# Altium PCB CW341_KintexUSTarget.PcbDoc (part 4 of 7)
Units mil, origin at the board's own origin, x right, y up, seen from the top; angles counter-clockwise.
Board outline 4566.97 x 5485 mil, 6 copper layers (Top Layer, Layer 2 (GND), Layer 3 (sig), Layer 4 (sig), Layer 5 (PWR), Bottom Layer), stack 61.068 mil thick; 157 components, 262 nets, 1869 pads, 1478 vias.
Unrouted connection lines stored in the file: 128.
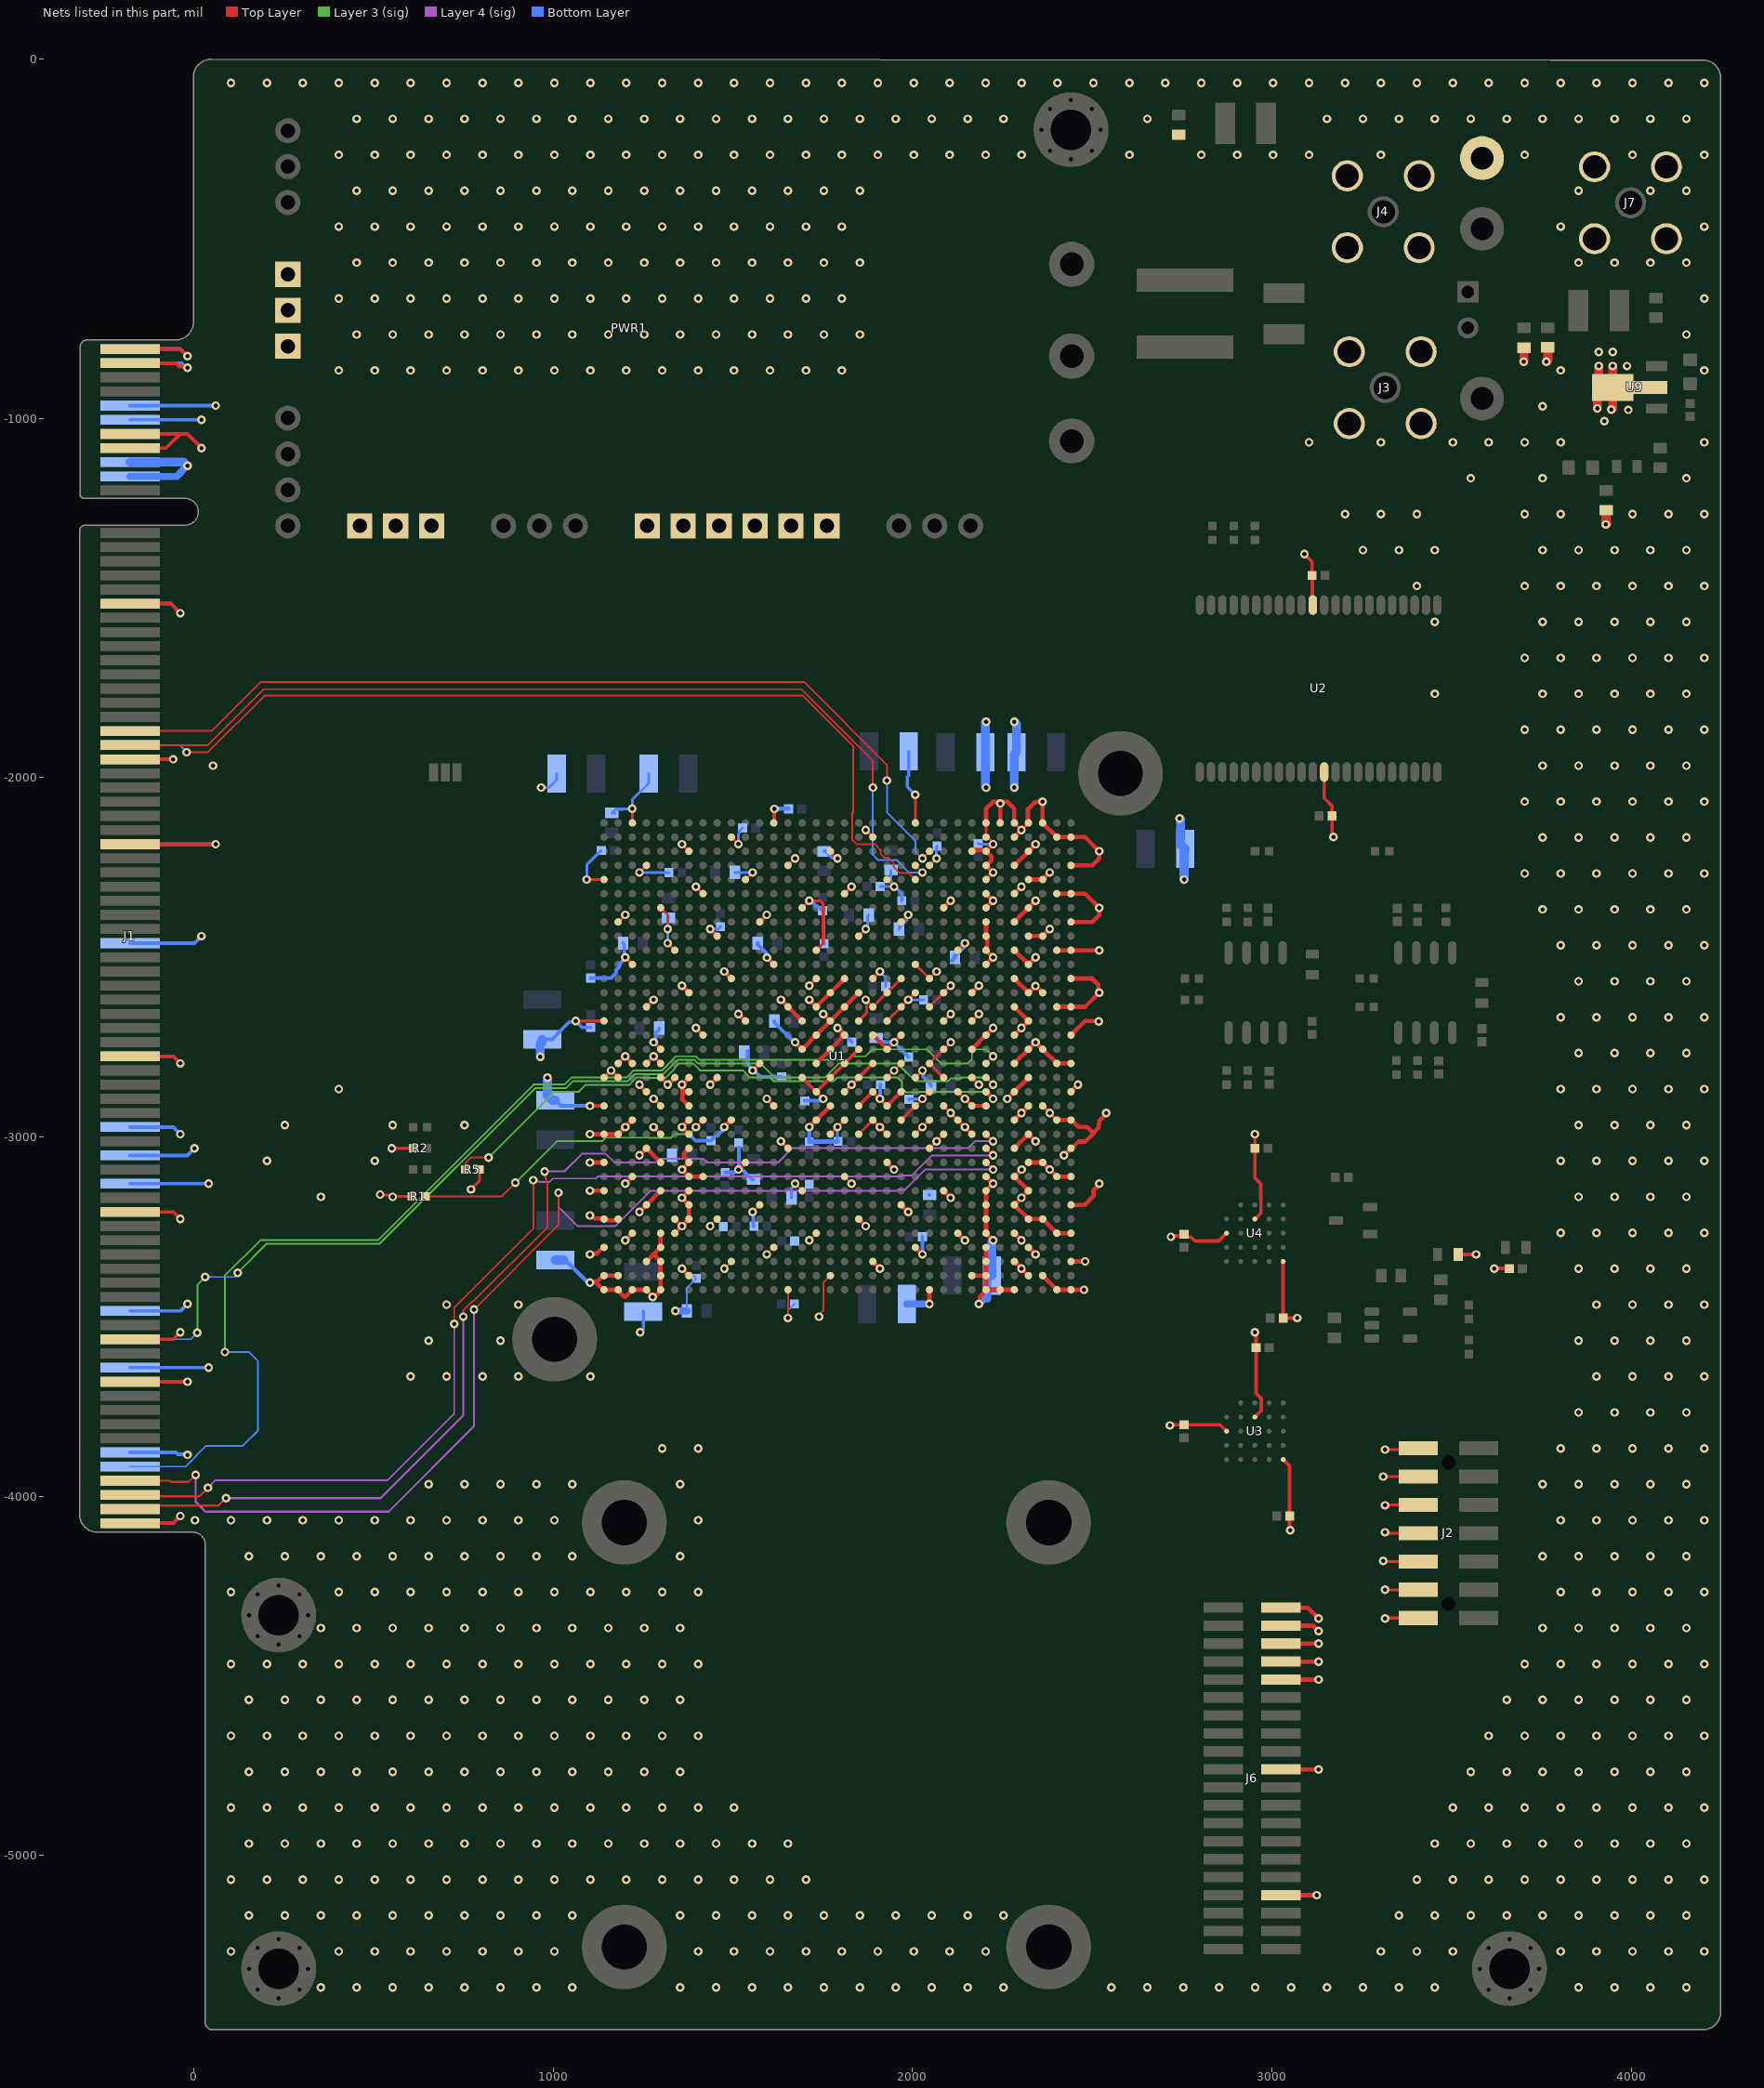
[diagram p7: the nets of this part, all layers, seen from the top]

## Via types
v1: diameter 24, hole 12, Top Layer to Bottom Layer, tented both sides, 1463 vias
v2: diameter 24, hole 10, Top Layer to Bottom Layer, tented both sides, 15 vias

## Nets (pads, with @x,y where several pads share a name; then routed paths per layer and width w, separated by ;. In a path a pad name is that pad's centre, name@x,y a point inside that pad or via, vN(x,y) a via of type N, cw(c..) or ccw(c..) an arc to the next point about the centre after c; other vN are vias at no path point) (continued)
CFG_PGM: J1.A69 U1.T7 | length 2899
  Top Layer w5: U1.T7@2204.72,-2834.65 v1(2224.41,-2854.33)
  Layer 3 (sig) w5: v1(10,-3545) 10,-3411.26 v1(31.5,-3389.76) ; v1@127.66,-3377.95 127.66,-3372.34 202.78,-3297.22 516.71,-3297.22 949.78,-2864.15 1035.84,-2864.15 1055.53,-2844.46 1208.31,-2844.46 1227.94,-2824.83 1252.38,-2824.83 1252.64,-2825.09 1306.42,-2825.09 1346.05,-2785.46 1393.55,-2785.46 1403.81,-2795.72 1501.02,-2795.72 1501.28,-2795.46 1563.2,-2795.46 1563.46,-2795.72 1578.18,-2795.72 1616.92,-2834.46 1755,-2834.46 1793.74,-2795.72 1822.37,-2795.72 1822.63,-2795.46 1956.9,-2795.46 1959.55,-2798.12 1961.64,-2798.12 2007.98,-2844.46 2099.06,-2844.46 2106.98,-2836.54 2135.89,-2836.54 2137.59,-2834.83 2193.12,-2834.83 2194.82,-2836.54 2206.62,-2836.54 v1(2224.41,-2854.33)
  Bottom Layer w5: J1.A69@-177.17,-3562.99 -7.99,-3562.99 v1(10,-3545) ; v1(31.5,-3389.76) 114.17,-3389.76 122.05,-3381.89 v1(122.05,-3377.95)
CFG_PUDC: R5.1 U1.R7 | length 1691.1
  Top Layer w5: R5.1@755.91,-3090.55 755.91,-3072.83 771.57,-3057.17 v1(820.83,-3057.17)
  Top Layer w12: U1.R7@2204.72,-2874.02 v1(2224.41,-2893.7)
  Layer 3 (sig) w5: v1(820.83,-3057.17) 1003.86,-2874.15 1071.6,-2874.15 1091.28,-2854.46 1212.45,-2854.46 1232.08,-2834.83 1248.23,-2834.83 1248.49,-2835.09 1312.65,-2835.09 1338.77,-2808.97 1338.77,-2806.88 1350.19,-2795.46 1389.41,-2795.46 1408.78,-2814.83 1527.41,-2814.83 1547.41,-2834.83 1603.14,-2834.83 1612.77,-2844.46 1781.06,-2844.46 1790.69,-2834.83 1958.98,-2834.83 1970.59,-2846.44 1970.59,-2863.58 1982.2,-2875.19 2020.58,-2875.19 2021.57,-2874.2 2207,-2874.2 2224.41,-2891.61 v1(2224.41,-2893.7)
CFG_RDWR: J1.A78 U1.U7 | length 3391.5
  Top Layer w5: U1.U7@2204.72,-2795.28 v1(2224.41,-2775.59)
  Layer 3 (sig) w5: v1(86.61,-3598.43) 86.61,-3385.81 185.21,-3287.22 512.57,-3287.22 945.64,-2854.15 1031.7,-2854.15 1051.38,-2834.46 1204.17,-2834.46 1223.8,-2814.83 1256.52,-2814.83 1256.78,-2815.09 1302.28,-2815.09 1341.91,-2775.46 1397.7,-2775.46 1407.96,-2785.72 1496.88,-2785.72 1497.14,-2785.46 1613.1,-2785.46 1613.35,-2785.72 1820.32,-2785.72 1830.58,-2775.46 1869.01,-2775.46 1888.38,-2756.09 2039.81,-2756.09 2078.81,-2795.09 2153.75,-2795.09 2165.35,-2783.48 2165.35,-2767.7 2176.96,-2756.09 2204.91,-2756.09 v1(2224.41,-2775.59)
  Bottom Layer w5: J1.A78@-177.17,-3917.32 -22.84,-3917.32 35.03,-3859.45 136.61,-3859.45 179,-3817.06 179,-3623.88 153.54,-3598.43 v1(86.61,-3598.43)
CSI_ADV_B: R1.1 U1.N27 | length 861.1
  Top Layer w5: R1.1@645.67,-3165.35 856.84,-3165.35 v1(895.07,-3127.12) ; v1(1397.64,-2972.44) U1.N27@1417.32,-2952.76
  Layer 3 (sig) w5: v1(895.07,-3127.12) 1010.56,-3011.63 1136.4,-3011.63 1146.35,-3001.68 1267.05,-3001.68 1267.31,-3001.94 1328.77,-3001.94 1338.4,-2992.31 1379.73,-2992.31 1397.64,-2974.4 v1(1397.64,-2972.44)
CWIO_HS1: J1.A27 U1.AK12 | length 2640.1
  Top Layer w5: v1(-19.69,-1929.13) 39.37,-1929.13 196.85,-1771.65 1694.26,-1771.65 1835.36,-1912.75 1835.36,-2094.7 1832.46,-2097.59 1832.46,-2172.78 1844.72,-2185.04 1895.44,-2185.04 1911.2,-2200.8 1911.2,-2212.15 1921.71,-2222.66 1933.06,-2222.66 1947.07,-2236.67 1947.07,-2248.02 1964.58,-2265.53 1989.94,-2265.53 U1.AK12@2007.87,-2283.46
  Bottom Layer w5: J1.A27@-177.17,-1909.45 -39.37,-1909.45 v1(-19.69,-1929.13)
CWIO_HS2: J1.B27 U1.AL12 | length 2662.2
  Top Layer w5: J1.B27@-177.17,-1909.45 39.37,-1909.45 194.96,-1753.86 1690.61,-1753.86 1889.76,-1953.01 v1(1889.76,-2027.56) ; U1.AL12@2007.87,-2244.09 v1(2027.56,-2263.78)
  Bottom Layer w5: v1(1889.76,-2027.56) 1889.76,-2214.57 1904.86,-2229.66 1956.57,-2229.66 1966.26,-2239.35 1966.26,-2239.77 1990.86,-2264.36 2026.98,-2264.36 v1(2027.56,-2263.78)
CWIO_IO4: J1.B26 U1.AM11 | length 2587.1
  Top Layer w5: J1.B26@-177.17,-1870.08 50.46,-1870.08 186.68,-1733.86 1698.89,-1733.86 1929.13,-1964.1 1929.13,-2007.74 v1(1929,-2007.87) ; v1(2027.56,-2224.41) U1.AM11@2047.24,-2204.72
  Bottom Layer w5: v1(1929,-2007.87) 1929,-2096.19 2008.06,-2175.24 2008.06,-2204.91 v1(2027.56,-2224.41)
FPGA_M0: J1.B79 U1.K7 | length 3262.8
  Top Layer w5: v1(780,-3480) 1015,-3245 v1(1015,-3155)
  Top Layer w6: J1.B79@-177.17,-3956.69 -65.56,-3956.69 -62.25,-3960 -14.48,-3960 v1(5.26,-3940.26)
  Top Layer w8: U1.K7@2204.72,-3070.87 v1(2224.41,-3090.55)
  Layer 4 (sig) w5: v1(1015,-3155) 1015,-3194.87 1067.84,-3247.72 1173.53,-3247.72 1271.69,-3149.55 1445.09,-3149.55 1445.21,-3149.42 1956.9,-3149.42 1959.28,-3147.03 1978.61,-3147.03 2035.1,-3090.55 v1(2224.41,-3090.55)
  Layer 4 (sig) w6: v1(5.26,-3940.26) 5.26,-4015.26 32.51,-4042.51 542.49,-4042.51 780,-3805 v1(780,-3480)
FPGA_M1: J1.B80 U1.L7 | length 3086.1
  Top Layer w5: v1(725,-3520) 725,-3475 944.88,-3255.12 v1(944.88,-3119.92)
  Top Layer w6: J1.B80@-177.17,-3996.06 -173.23,-4000 15.75,-4000 v1(39.37,-3976.38)
  Top Layer w8: U1.L7@2204.72,-3031.5 v1(2224.41,-3051.18)
  Layer 4 (sig) w5: v1@44.51,-3976.38 v1(39.37,-3976.38) 60.75,-3955 540,-3955 725,-3770 v1(725,-3520) ; v1(944.88,-3119.92) 948.52,-3123.56 961.95,-3123.56 964.17,-3125.77 988.37,-3125.77 998.64,-3115.5 1119.4,-3115.5 1124.61,-3110.29 1967.27,-3110.29 1969.97,-3107.59 1997.78,-3107.59 2054.19,-3051.18 v1(2224.41,-3051.18)
FPGA_M2: J1.B81 U1.M7 | length 3154.8
  Top Layer w5: v1(750,-3500) 750,-3482.42 773.96,-3458.46 776.54,-3458.46 984.25,-3250.75 984.25,-3128.27 981.75,-3125.77 981.75,-3118.91 979.15,-3116.3 979.15,-3099.03 v1(976.27,-3096.15)
  Top Layer w6: J1.B81@-177.17,-4035.43 -167.32,-4025.59 69.41,-4025.59 v1(90,-4005)
  Top Layer w8: U1.M7@2204.72,-2992.13 v1(2224.41,-3011.81)
  Layer 4 (sig) w5: v1(976.27,-3096.15) 976.92,-3095.5 1031.57,-3095.5 1080.41,-3046.65 1146.39,-3046.65 1170.42,-3070.68 1285.26,-3070.68 1294.89,-3061.05 1419.25,-3061.05 1429.14,-3070.94 1625.89,-3070.94 1665.52,-3031.31 2153.75,-3031.31 2173.25,-3011.81 v1(2224.41,-3011.81)
  Layer 4 (sig) w6: v1(90,-4005) 520,-4005 750,-3775 v1(750,-3500)
GND: C1.2 C2.2 C3.2 C4.2 C7.2 C8.2 C9.2 C11.2 C19.2 C20.2 C21.2 C22.2 C23.2 C24.2 C25.2 C26.2 C27.2 C29.2 C30.2 C31.2 C32.2 C33.2 C34.2 C35.2 C36.2 C37.2 C38.2 C39.2 C40.2 C41.2 C42.2 C43.2 C44.2 C45.2 C46.2 C47.2 C48.2 C49.2 C50.2 C51.2 C52.2 C53.2 C54.2 C55.2 C56.2 C57.2 C58.2 C59.2 C60.2 C61.2 C62.2 C63.2 C64.2 C65.2 C66.2 C67.2 C68.2 C69.2 C70.2 C71.2 C72.2 C73.2 C74.2 C75.2 C76.2 C77.2 C78.2 C79.2 C80.2 C81.2 C82.2 C83.2 C84.2 C85.2 C86.1 C87.1 C88.2 C94.2 J1.A1 J1.A2 J1.A5 J1.A6 J1.A9 J1.A10 J1.A17 J1.A28 J1.A34 J1.A41 J1.A49 J1.A54 J1.A56 J1.A58 J1.A67 J1.A71 J1.A77 J1.A82 J1.B1 J1.B2 J1.B7 J1.B8 J1.B17 J1.B28 J1.B34 J1.B49 J1.B60 J1.B69 J1.B72 J1.B82 J2.1 J2.3 J2.5 J2.7 J2.9 J2.11 J2.13 J3.MH J4.MH J6.2 J6.4 J6.6 J6.8 J6.10 J6.20 J6.34 J7.MH L4.1 PWR1.4 PWR1.5 PWR1.6 PWR1.11 PWR1.12 PWR1.13 PWR1.17 PWR1.18 PWR1.19 PWR1.20 PWR1.21 PWR1.22 R1.2 R2.2 R5.2 TP4.1 U1.A1 U1.A2 U1.A5 U1.A6 U1.A7 U1.A11 U1.A21 U1.A30 U1.A31 U1.A32 U1.A33 U1.A34 U1.AA1 U1.AA2 U1.AA5 U1.AA11 U1.AA13 U1.AA15 U1.AA17 U1.AA19 U1.AA21 U1.AA31 U1.AB3 U1.AB4 U1.AB8 U1.AB10 U1.AB12 U1.AB14 U1.AB16 U1.AB18 U1.AB28 U1.AC1 U1.AC5 U1.AC11 U1.AC13 U1.AC15 U1.AC17 U1.AC19 U1.AC25 U1.AD4 U1.AD7 U1.AD12 U1.AD22 U1.AD32 U1.AE1 U1.AE2 U1.AE5 U1.AE7 U1.AE9 U1.AE19 U1.AE29 U1.AF3 U1.AF4 U1.AF7 U1.AF16 U1.AF26 U1.AG1 U1.AG5 U1.AG7 U1.AG13 U1.AG23 U1.AG33 U1.AH4 U1.AH7 U1.AH10 U1.AH20 U1.AH30 U1.AJ1 U1.AJ2 U1.AJ5 U1.AJ7 U1.AJ17 U1.AJ27 U1.AK3 U1.AK4 U1.AK7 U1.AK14 U1.AK24 U1.AK34 U1.AL1 U1.AL5 U1.AL7 U1.AL11 U1.AL21 U1.AL31 U1.AM4 U1.AM7 U1.AM8 U1.AM18 U1.AM28 U1.AN1 U1.AN2 U1.AN5 U1.AN7 U1.AN15 U1.AN25 U1.AP3 U1.AP4 U1.AP5 U1.AP6 U1.AP7 U1.AP12 U1.AP22 U1.AP32 U1.B3 U1.B4 U1.B7 U1.B8 U1.B18 U1.B28 U1.B30 U1.B33 U1.B34 U1.C1 U1.C5 U1.C7 U1.C15 U1.C25 U1.C30 U1.C31 U1.D4 U1.D7 U1.D12 U1.D22 U1.D30 U1.D34 U1.E1 U1.E2 U1.E5 U1.E7 U1.E9 U1.E19 U1.E29 U1.E30 U1.E32 U1.F3 U1.F4 U1.F7 U1.F16 U1.F26 U1.F28 U1.F29 U1.F33 U1.F34 U1.G1 U1.G5 U1.G7 U1.G13 U1.G23 U1.G28 U1.G31 U1.H4 U1.H7 U1.H10 U1.H20 U1.H28 U1.H30 U1.H34 U1.J1 U1.J2 U1.J5 U1.J7 U1.J17 U1.J27 U1.J28 U1.J32 U1.K3 U1.K4 U1.K14 U1.K24 U1.K28 U1.K30 U1.K34 U1.L1 U1.L5 U1.L11 U1.L21 U1.L28 U1.L31 U1.M4 U1.M8 U1.M10 U1.M12 U1.M14 U1.M16 U1.M18 U1.M28 U1.M30 U1.M33 U1.M34 U1.N1 U1.N2 U1.N5 U1.N9 U1.N11 U1.N13 U1.N15 U1.N17 U1.N19 U1.N25 U1.N28 U1.N32 U1.P3 U1.P4 U1.P7 U1.P8 U1.P10 U1.P12 U1.P14 U1.P16 U1.P18 U1.P22 U1.P28 U1.P30 U1.P34 U1.R1 U1.R5 U1.R9 U1.R11 U1.R13 U1.R15 U1.R17 U1.R19 U1.R28 U1.R31 U1.T4 U1.T8 U1.T10 U1.T12 U1.T14 U1.T16 U1.T18 U1.T20 U1.T26 U1.T28 U1.T29 U1.T30 U1.T33 U1.T34 U1.U1 U1.U2 U1.U5 U1.U11 U1.U13 U1.U15 U1.U17 U1.U19 U1.U23 U1.U30 U1.U31 U1.U32 U1.U33 U1.V3 U1.V4 U1.V8 U1.V10 U1.V14 U1.V16 U1.V18 U1.V20 U1.V30 U1.W1 U1.W5 U1.W7 U1.W13 U1.W15 U1.W17 U1.W19 U1.W27 U1.Y4 U1.Y8 U1.Y10 U1.Y14 U1.Y16 U1.Y18 U1.Y20 U1.Y24 U1.Y34 U2.12 U2.34 U3.B3 U3.C1 U3.E5 U4.B3 U4.C1 U4.E5 U9.2 U9.4 | length 25088.7
  Top Layer w5: v1(1437.01,-3248.03) U1.F26@1456.69,-3228.35 ; v1(1476.66,-3366.43) 1476.66,-3366.14 1496.06,-3346.74 U1.C25@1496.06,-3346.46 ; v1(1555.12,-3208.66) U1.G23@1574.8,-3188.98 ; v1(1594.49,-3326.77) U1.D22@1614.17,-3307.09 ; v1(1653.54,-3503.94) U1.A21@1653.54,-3425.2 ; v1(1673.23,-3129.92) U1.H20@1692.91,-3149.61 ; v1(1712.6,-3287.4) U1.E19@1732.28,-3267.72 ; v1(1740.26,-3500.12) 1740.26,-3494.98 1751.97,-3483.27 1751.97,-3405.51 U1.B18@1771.65,-3385.83 ; U1.J17@1811.02,-3110.24 v1(1830.71,-3129.92)
  Top Layer w8: v1(518.51,-3160.24) 519.62,-3161.35 542.51,-3161.35 546.51,-3165.35 R1.2@606.3,-3165.35 ; v1(551.18,-3031.5) R2.2@610.24,-3031.5 ; v1(771.65,-3145.67) 795.28,-3122.05 R5.2@795.28,-3090.55 ; v1(1062.99,-2677.17) U1.Y34@1141.73,-2677.17 ; v1(1093.79,-2283.46) U1.AK34@1141.73,-2283.46 ; U1.AG33@1181.1,-2401.57 v1(1200.79,-2381.89) ; v1(1200.79,-2500) U1.AD32@1220.47,-2519.69 ; U1.AP32@1220.47,-2125.98 v1(1220.47,-2086.61) ; v1(1240.16,-2263.78) U1.AL31@1259.84,-2244.09 ; U1.AH30@1299.21,-2362.2 1318.9,-2381.89 v1(1318.9,-2421.26) ; v1(1318.9,-2460.63) U1.AE29@1338.58,-2480.32 ; v1(1358.27,-2185.04) U1.AM28@1377.95,-2204.72 ; v1(1397.64,-2303.15) U1.AJ27@1417.32,-2322.83 ; U1.AN25@1496.06,-2165.35 v1@1515.59,-2184.93 ; U1.AK24@1535.43,-2283.46 v1(1555.12,-2263.78) ; v1(1633.86,-3011.81) U1.L21@1653.54,-3031.5 ; U1.AL21@1653.54,-2244.09 v1(1673.23,-2224.41) ; U1.AH20@1692.91,-2362.2 v1(1712.6,-2342.52) 1743.24,-2342.52 1751.72,-2351 1751.72,-2460.88 U1.AE19@1732.28,-2480.32 ; U1.M18@1771.65,-2992.13 v1(1791.34,-2972.44) U1.N17@1811.02,-2952.76 ; U1.AM18@1771.65,-2204.72 1771.65,-2206.68 1781.52,-2216.55 v1@1781.52,-2218.5 ; U1.AJ17@1811.02,-2322.83 v1(1830.71,-2303.15) ; U1.M16@1850.39,-2992.13 U1.N15@1889.76,-2952.76 v1(1909.45,-2972.44) U1.M14@1929.13,-2992.13 ; U1.Y16@1850.39,-2677.17 1872.17,-2655.39 v1@1872.17,-2620.2 ; U1.AF16@1850.39,-2440.94 v1(1870.08,-2421.26) ; v1(1870.08,-2618.11) v1@1872.17,-2620.2 ; v1(1870.08,-2145.67) U1.AN15@1889.76,-2165.35 ; U1.AC15@1889.76,-2559.06 v1(1909.45,-2539.37) ; U1.T14@1929.13,-2834.65 v1(1948.82,-2814.96) U1.U13@1968.5,-2795.28 ; U1.Y14@1929.13,-2677.17 U1.AA13@1968.5,-2637.8 v1(1988.19,-2618.11) ; U1.AK14@1929.13,-2283.46 v1(1948.82,-2303.15) ; U1.AC13@1961.13,-2566.43 U1.AB14@1929.13,-2598.43 U1.AA15@1889.76,-2637.8 v1@1872.17,-2620.2 ; U1.N13@1968.5,-2952.76 U1.P12@2007.87,-2913.39 v1(2027.56,-2893.7) U1.R11@2047.24,-2874.02 ; U1.AG13@1968.5,-2401.57 1968.79,-2401.57 v1(1988.48,-2381.89) ; U1.M12@2007.87,-2992.13 v1(2027.56,-2972.44) U1.N11@2047.24,-2952.76 ; U1.T12@2007.87,-2834.65 v1(2027.56,-2814.96) ; U1.AD12@2007.87,-2518.2 U1.AD12@2007.87,-2519.69 U1.AC11@2047.24,-2559.06 v1(2066.93,-2539.37) ; U1.AP12@2007.87,-2125.98 v1(2007.87,-2047.24) ; U1.L11@2047.24,-3031.5 v1(2066.93,-3011.81) U1.M10@2086.61,-2992.13 ; U1.AA11@2047.24,-2637.8 U1.AB10@2086.61,-2598.43 v1(2106.3,-2578.74) ; U1.AL11@2047.24,-2244.09 v1(2066.93,-2224.41) ; U1.P10@2086.61,-2913.39 v1(2106.3,-2933.07) U1.N9@2125.98,-2952.76 ; U1.T10@2086.61,-2834.65 U1.U11@2047.24,-2795.28 U1.V10@2086.61,-2755.91 2088.7,-2755.91 2088.7,-2754.11 v1(2106.59,-2736.22) ; U1.Y10@2086.61,-2677.17 v1(2106.3,-2657.48) ; U1.T8@2165.35,-2834.65 v1(2185.04,-2854.33) ; U1.Y8@2165.35,-2677.17 v1(2185.04,-2657.48) ; U1.AP7@2204.72,-2125.98 U1.AN7@2204.72,-2165.35 2208.21,-2165.35 2214.31,-2171.46 2215.16,-2171.46 2224.41,-2180.71 v1(2224.41,-2185.04) ; U1.AP5@2283.46,-2125.98 v1(2303.15,-2145.67) U1.AP4@2322.83,-2125.98 ; v1(2381.89,-2933.07) U1.N2@2401.57,-2952.76 ; v1(3310,-4180) 3311.42,-4181.42 J2.9@3407.56,-4181.42 ; v1(3310,-3945) 3310.2,-3945.2 J2.3@3407.56,-3945.2 ; v1(3314.65,-4100) 3317.32,-4102.68 J2.7@3407.56,-4102.68 ; v1(3315,-4340) 3316.1,-4338.9 J2.13@3407.56,-4338.9 ; v1(3315,-4260) 3315.16,-4260.16 J2.11@3407.56,-4260.16 ; v1(3315,-4025) 3316.06,-4023.94 J2.5@3407.56,-4023.94 ; v1(3315,-3870) 3404.01,-3870 J2.1@3407.56,-3866.45
  Top Layer w10: J1.B82@-177.17,-4074.8 -56.97,-4074.8 v1(-37.28,-4055.12) ; J1.B72@-177.17,-3681.1 v1(-17.6,-3681.1) ; J1.B69@-177.17,-3562.99 -56.97,-3562.99 v1(-37.28,-3543.31) ; J1.B60@-177.17,-3208.66 -56.97,-3208.66 v1(-37.28,-3228.35) ; J1.B49@-177.17,-2775.59 -56.97,-2775.59 v1(-37.28,-2795.28) ; J1.B34@-177.17,-2185.04 v1(61.14,-2185.04) ; J1.B28@-177.17,-1948.82 v1(-56.97,-1948.82) ; J1.B17@-177.17,-1515.75 -63.85,-1515.75 v1(-37.28,-1542.32) ; J1.B8@-177.17,-1082.68 -76.65,-1082.68 -37.28,-1043.31 ; J1.B7@-177.17,-1043.31 -37.28,-1043.31 ; J1.B2@-177.17,-846.46 -49.6,-846.46 -39.91,-856.15 -20.28,-856.15 v1(-17.6,-858.83) ; J1.B1@-177.17,-807.09 -37.28,-807.09 v1(-17.6,-826.77) ; v1(21.77,-1082.68) -17.6,-1043.31 -37.28,-1043.31 ; v1(1102.36,-2913.39) U1.P34@1141.73,-2913.39 ; U1.T34@1141.73,-2834.65 v1(1161.42,-2814.96) U1.T33@1181.1,-2834.65 ; U1.U33@1181.1,-2795.28 v1(1200.79,-2775.59) U1.U32@1220.47,-2795.28 ; v1(1240.16,-2854.33) U1.R31@1259.84,-2874.02 ; U1.U31@1259.84,-2795.28 v1(1279.53,-2775.59) U1.U30@1299.21,-2795.28 ; U1.AA31@1259.84,-2637.8 v1(1279.53,-2618.11) ; v1(1279.53,-2972.44) U1.M30@1299.21,-2992.13 ; v1(1279.53,-2893.7) U1.P30@1299.21,-2913.39 ; v1(1279.53,-2736.22) U1.V30@1299.21,-2755.91 ; U1.T30@1299.21,-2834.65 v1(1318.9,-2854.33) ; U1.E29@1338.58,-3267.72 v1(1358.27,-3248.03) U1.F29@1338.58,-3228.35 ; v1(1397.64,-2696.85) U1.W27@1417.32,-2716.54 ; v1(1594.49,-2893.7) U1.P22@1614.17,-2913.39 ; U1.AP22@1614.17,-2125.98 1615.14,-2125.02 1615.14,-2087.73 v1(1616.11,-2086.76) ; U1.T20@1692.91,-2834.65 U1.R19@1732.28,-2874.02 ; v1(1712.6,-2578.74) U1.AC19@1732.28,-2559.06 ; v1(1751.97,-2893.7) U1.R19@1732.28,-2874.02 ; U1.R17@1811.02,-2874.02 v1(1830.71,-2854.33) U1.T16@1850.39,-2834.65 U1.U15@1889.76,-2795.28 ; U1.P16@1850.39,-2913.39 U1.R15@1889.76,-2874.02 v1(1909.45,-2893.7) U1.P14@1929.13,-2913.39 U1.R13@1968.5,-2874.02 ; U1.V16@1850.39,-2755.91 U1.U17@1811.02,-2795.28 U1.T18@1771.65,-2834.65 U1.R19@1732.28,-2874.02 ; U1.W15@1889.76,-2716.54 U1.V14@1929.13,-2755.91 v1(1948.82,-2736.22) U1.W13@1968.5,-2716.54 ; v1(1988.19,-2618.11) U1.AB12@2007.87,-2598.43 ; U1.N9@2125.98,-2952.76 v1(2145.67,-2972.44) U1.M8@2165.35,-2992.13 ; U1.R9@2125.98,-2874.02 v1(2145.67,-2893.7) U1.P8@2165.35,-2913.39 U1.P7@2204.72,-2913.39 ; 2293.31,-3356.3 v1(2303.15,-3366.14) U1.B4@2322.83,-3385.83 ; U1.P3@2362.2,-2913.39 v1(2381.89,-2933.07) ; v1(2716.54,-3802.58) 2718.33,-3800.79 C1.2@2755.91,-3800.79 2855.91,-3800.79 U3.C1@2874.02,-3818.9 ; v1(2719.24,-3277.81) 2721.92,-3275.13 2751.64,-3275.13 C2.2@2755.91,-3270.87 2763.5,-3278.46 2774.91,-3278.46 2786.16,-3289.72 2816.49,-3289.72 2816.67,-3289.53 2852.2,-3289.53 U4.C1@2874.02,-3267.72 ; U3.B3@2952.76,-3779.53 2970.13,-3762.16 2970.13,-3728 2955.91,-3713.78 C4.2@2955.91,-3586.13 2955.91,-3546.46 v1(2952.76,-3543.31) ; U4.B3@2952.76,-3228.35 2969.65,-3211.46 2969.65,-3171.19 2968.81,-3170.36 2968.81,-3130.09 2952.76,-3114.04 C3.2@2952.76,-3031.5 v1(2952.76,-2992.13) ; U3.E5@3031.5,-3897.64 3049.61,-3915.75 C8.2@3049.61,-4055.12 3049.61,-4092.91 v1(3051.18,-4094.49) ; U4.E5@3031.5,-3346.46 C7.2@3031.5,-3503.94 v1(3070.87,-3503.94) ; v1(3090.55,-1377.95) 3111.81,-1399.21 C9.2@3111.81,-1437.01 3112.99,-1438.19 3112.99,-1518.5 U2.34@3114.17,-1519.69 ; U2.12@3145.67,-1984.25 3145.67,-2056.65 3167.72,-2078.7 C11.2@3167.72,-2106.3 3167.72,-2161.69 v1(3171.38,-2165.35) ; L4.1@3518.62,-3326.77 v1(3568.62,-3326.77) ; v1@3619.05,-3366.14 C19.2@3660.75,-3366.14
  Top Layer w12: v1(1102.36,-3405.51) 1104.66,-3403.22 1121.94,-3403.22 1139.33,-3385.83 U1.B34@1141.73,-3385.83 U1.B33@1181.1,-3385.83 ; v1(1102.36,-3326.77) 1104.66,-3324.48 1121.94,-3324.48 1139.33,-3307.09 U1.D34@1141.73,-3307.09 ; v1(1102.36,-3218.53) 1105.61,-3218.53 1113.73,-3226.65 1140.04,-3226.65 1143.43,-3230.04 1150.27,-3230.04 1151.89,-3231.66 1175.39,-3231.66 1178.7,-3228.35 U1.F33@1181.1,-3228.35 ; v1(1102.36,-3149.61) U1.H34@1141.73,-3149.61 ; v1(1102.36,-3070.87) U1.K34@1141.73,-3070.87 ; v1(1102.36,-2992.13) U1.M34@1141.73,-2992.13 U1.M33@1181.1,-2992.13 v1(1200.79,-2972.44) U1.N32@1220.47,-2952.76 ; 1121.94,-3407.81 1139.33,-3425.2 U1.A34@1141.73,-3425.2 U1.A33@1181.1,-3425.2 1181.1,-3427.6 1198.49,-3444.99 ; 1200.79,-3445.72 1220.47,-3426.04 U1.A32@1220.47,-3425.2 U1.A31@1259.84,-3425.2 1259.84,-3427.6 v1(1277.23,-3444.99) ; v1(1200.79,-3287.4) U1.E32@1220.47,-3267.72 ; v1(1200.79,-3129.92) U1.J32@1220.47,-3110.24 ; v1(1240.16,-3208.66) U1.G31@1259.84,-3188.98 U1.H30@1299.21,-3149.61 ; v1(1240.16,-3051.18) U1.L31@1259.84,-3031.5 U1.K30@1299.21,-3070.87 ; U1.C31@1259.84,-3346.46 1279.53,-3326.77 ; v1@1281.82,-3444.99 1299.21,-3427.6 U1.A30@1299.21,-3425.2 U1.B30@1299.21,-3385.83 U1.C30@1299.21,-3346.46 1279.53,-3326.77 ; U1.E30@1299.21,-3267.72 U1.D30@1299.21,-3307.09 1279.53,-3326.77 ; v1(1318.9,-2854.33) U1.T29@1338.58,-2834.65 ; v1(1358.27,-3366.14) U1.B28@1377.95,-3385.83 ; v1(1358.27,-3248.03) U1.F28@1377.95,-3228.35 U1.G28@1377.95,-3188.98 v1(1358.27,-3169.29) U1.H28@1377.95,-3149.61 ; v1(1358.27,-2578.74) U1.AB28@1377.95,-2598.43 ; U1.L28@1377.95,-3031.5 1363.24,-3046.21 1363.24,-3053.75 1377.95,-3068.47 U1.K28@1377.95,-3070.87 v1(1358.27,-3090.55) U1.J28@1377.95,-3110.24 U1.J27@1417.32,-3110.24 ; U1.M28@1377.95,-2992.13 v1(1358.27,-2972.44) U1.N28@1377.95,-2952.76 ; U1.P28@1377.95,-2913.39 1358.71,-2894.14 1360.02,-2892.83 1360.02,-2874.46 ; U1.R28@1377.95,-2874.02 1377.51,-2874.46 1360.02,-2874.46 ; U1.T28@1377.95,-2834.65 v1(1358.27,-2854.33) 1360.02,-2856.08 1360.02,-2874.46 ; v1(1437.01,-2854.33) U1.T26@1456.69,-2834.65 ; v1(1437.01,-2421.26) U1.AF26@1456.69,-2440.94 ; v1(1476.38,-2972.44) U1.N25@1496.06,-2952.76 ; v1(1476.38,-2539.37) U1.AC25@1496.06,-2559.06 ; v1(1515.75,-3090.55) U1.K24@1535.43,-3070.87 ; v1(1515.75,-2657.48) U1.Y24@1535.43,-2677.17 ; v1(1555.12,-2814.96) U1.U23@1574.8,-2795.28 ; U1.AG23@1574.8,-2401.57 v1(1594.49,-2381.89) ; v1(1595.5,-2500.95) 1614.17,-2519.62 U1.AD22@1614.17,-2519.69 ; v1(1633.86,-2618.11) U1.AA21@1653.54,-2637.8 U1.Y20@1692.91,-2677.17 ; v1(1673.23,-2736.22) U1.V20@1692.91,-2755.91 U1.W19@1732.28,-2716.54 U1.Y18@1771.65,-2677.17 ; v1(1712.6,-2972.44) U1.N19@1732.28,-2952.76 U1.P18@1771.65,-2913.39 ; v1(1712.6,-2618.11) U1.AA19@1732.28,-2637.8 U1.AB18@1771.65,-2598.43 U1.AC17@1811.02,-2559.06 ; U1.U19@1732.28,-2795.28 U1.V18@1771.65,-2755.91 1803.65,-2723.91 1803.65,-2709.16 ; v1(1751.97,-2657.48) U1.Y18@1771.65,-2677.17 ; v1(1791.34,-2696.85) 1803.65,-2709.16 ; U1.W17@1811.02,-2716.54 1803.65,-2709.16 ; U1.F16@1850.39,-3228.35 v1(1870.08,-3248.03) ; U1.AB16@1850.39,-2598.43 U1.AA17@1811.02,-2637.8 U1.Y18@1771.65,-2677.17 ; U1.C15@1889.76,-3346.46 v1(1909.45,-3366.14) ; U1.K14@1929.13,-3070.87 v1(1948.82,-3090.55) ; U1.G13@1968.5,-3188.98 v1(1988.19,-3208.66) ; U1.D12@2007.87,-3307.09 v1(2027.56,-3326.77) ; v1(2047.24,-3464.57) U1.A11@2047.24,-3425.2 ; U1.H10@2086.61,-3149.61 v1(2106.3,-3169.29) ; U1.AH10@2086.61,-2362.2 v1(2106.3,-2342.52) ; U1.E9@2125.98,-3267.72 v1(2145.67,-3287.4) ; U1.AE9@2125.98,-2480.32 v1(2145.67,-2460.63) ; U1.B8@2165.35,-3385.83 U1.B7@2204.72,-3385.83 ; U1.V8@2165.35,-2755.91 U1.W7@2204.72,-2716.54 v1(2224.41,-2696.85) ; U1.AB8@2165.35,-2598.43 v1(2185.04,-2578.74) ; U1.AM8@2165.35,-2204.72 2167.75,-2204.72 2171.07,-2201.41 2194.57,-2201.41 U1.AM7@2196.84,-2203.69 ; v1(2185.04,-3464.57) 2187.34,-3462.27 2187.34,-3444.99 2204.72,-3427.6 U1.A7@2204.72,-3425.2 ; U1.D7@2204.72,-3307.09 U1.C7@2204.72,-3346.46 U1.B7@2204.72,-3385.83 ; U1.J7@2204.72,-3110.24 v1(2224.41,-3129.92) U1.H7@2204.72,-3149.61 U1.G7@2204.72,-3188.98 U1.F7@2204.72,-3228.35 U1.E7@2204.72,-3267.72 v1(2224.41,-3287.4) ; U1.AD7@2204.72,-2519.69 v1(2224.41,-2500) U1.AE7@2204.72,-2480.32 2205.76,-2479.28 2205.76,-2472.43 2208.04,-2470.16 2208.04,-2446.66 2204.72,-2443.34 U1.AF7@2204.72,-2440.94 U1.AG7@2204.72,-2401.57 ; U1.AH7@2204.72,-2362.2 v1(2224.41,-2342.52) U1.AJ7@2204.72,-2322.83 ; U1.AK7@2204.72,-2283.46 v1(2224.41,-2263.78) U1.AL7@2204.72,-2244.09 2219.44,-2229.38 2219.44,-2219.44 U1.AM7@2204.72,-2204.72 v1(2224.41,-2185.04) ; U1.AP7@2204.72,-2125.98 2204.72,-2086.61 2224.41,-2066.93 2224.46,-2066.98 v1@2244.09,-2066.98 ; U1.AP6@2244.09,-2125.98 v1(2244.09,-2071.63) v1@2244.09,-2066.98 ; v1(2263.78,-2893.7) U1.R5@2283.46,-2874.02 U1.T4@2322.83,-2834.65 ; U1.A5@2283.46,-3425.2 U1.A6@2244.09,-3425.2 U1.A7@2204.72,-3425.2 ; U1.C5@2283.46,-3346.46 2293.31,-3356.3 ; U1.E5@2283.46,-3267.72 v1(2303.15,-3287.4) ; U1.L5@2283.46,-3031.5 U1.M4@2322.83,-2992.13 v1(2342.52,-3011.81) ; U1.N5@2283.46,-2952.76 v1(2303.15,-2933.07) U1.P4@2322.83,-2913.39 ; U1.U5@2283.46,-2795.28 U1.V4@2322.83,-2755.91 v1(2342.52,-2736.22) U1.V3@2362.2,-2755.91 U1.U2@2401.57,-2795.28 U1.U1@2440.94,-2795.28 ; U1.W5@2283.46,-2716.54 v1(2303.15,-2696.85) U1.Y4@2322.83,-2677.17 U1.AA5@2283.46,-2637.8 ; U1.AC5@2283.46,-2559.06 U1.AB4@2322.83,-2598.43 2323.57,-2598.43 v1(2342.15,-2579.84) 2342.89,-2579.84 2361.47,-2598.43 U1.AB3@2362.2,-2598.43 ; U1.AE5@2283.46,-2480.32 U1.AD4@2322.83,-2519.69 v1(2342.52,-2500) ; U1.AG5@2283.46,-2401.57 U1.AH4@2322.83,-2362.2 v1(2342.52,-2342.52) ; U1.AJ5@2283.46,-2322.83 v1(2303.15,-2303.15) ; U1.AL5@2283.46,-2244.09 U1.AM4@2322.83,-2204.72 v1(2342.52,-2185.04) ; U1.AN5@2283.46,-2165.35 v1(2303.15,-2145.67) ; U1.AP5@2283.46,-2125.98 2283.46,-2086.61 2263.78,-2066.93 2244.09,-2066.93 v1@2244.09,-2066.98 ; v1(2303.44,-3090.55) 2283.75,-3110.24 U1.J5@2283.46,-3110.24 U1.H4@2322.83,-3149.61 v1(2303.15,-3169.29) U1.G5@2283.46,-3188.98 U1.F4@2322.83,-3228.35 U1.F3@2362.2,-3228.35 U1.E2@2401.57,-3267.72 U1.E1@2440.94,-3267.72 ; U1.D4@2322.83,-3307.09 v1(2342.52,-3326.77) ; U1.K4@2322.83,-3070.87 U1.K3@2362.2,-3070.87 v1(2381.89,-3090.55) U1.J2@2401.57,-3110.24 U1.J1@2440.94,-3110.24 ; U1.AF4@2322.83,-2440.94 U1.AF3@2362.2,-2440.94 v1(2381.89,-2421.26) ; U1.AK4@2322.83,-2283.46 U1.AK3@2362.2,-2283.46 v1(2381.89,-2263.78) ; U1.AP4@2322.83,-2125.98 2321.14,-2124.29 U1.AP4@2321.14,-2118.02 ; U1.B3@2362.2,-3385.83 U1.A2@2401.57,-3425.2 U1.A1@2440.94,-3425.2 2441.04,-3425.29 2477.32,-3425.29 v1(2477.41,-3425.38) ; U1.N2@2401.57,-2952.76 U1.N1@2440.94,-2952.76 2442.26,-2952.76 2461.71,-2972.2 2486.19,-2972.2 2503.94,-2989.95 ; U1.AA2@2401.57,-2637.8 U1.AA1@2440.94,-2637.8 2480.31,-2637.8 v1(2519.69,-2598.43) 2517.39,-2596.13 2517.39,-2576.44 2500,-2559.06 U1.AC1@2440.94,-2559.06 ; U1.AE2@2401.57,-2480.32 U1.AE1@2440.94,-2480.32 v1(2519.69,-2480.32) ; U1.AJ2@2401.57,-2322.83 U1.AJ1@2440.94,-2322.83 2480.31,-2322.83 v1(2519.69,-2362.2) 2519.69,-2381.89 2500,-2401.57 U1.AG1@2440.94,-2401.57 ; v1(2421.26,-3051.18) U1.L1@2440.94,-3031.5 2443.34,-3031.5 2462.15,-3012.69 2481.2,-3012.69 2503.94,-2989.95 ; U1.C1@2440.94,-3346.46 v1(2480.31,-3346.46) ; U1.G1@2440.94,-3188.98 2479.16,-3188.98 2503.4,-3164.73 2503.4,-3149.64 2519.69,-3133.35 v1(2519.69,-3130.11) ; U1.R1@2440.94,-2874.02 v1(2460.63,-2854.33) ; U1.W1@2440.94,-2716.54 2480.31,-2677.17 2517.34,-2677.17 v1(2518.51,-2678.34) ; U1.AL1@2440.94,-2244.09 2500,-2244.09 2519.69,-2224.41 v1(2519.69,-2204.72) 2480.32,-2165.35 U1.AN1@2440.94,-2165.35 U1.AN2@2401.57,-2165.35 U1.AP3@2362.2,-2125.98 v1(2362.2,-2066.93) 2342.52,-2066.93 2321.1,-2088.35 U1.AP4@2321.1,-2117.98 ; v1(2539.37,-2933.07) 2539.37,-2935.78 2519.51,-2955.64 2519.51,-2964.13 2518.84,-2964.81 2518.84,-2973.29 2503.94,-2988.19 2503.94,-2989.95 ; J6.34@3025,-5110 v1(3125,-5110) ; J6.20@3025,-4760 v1@3120,-4760 ; J6.10@3025,-4510 v1(3130,-4510) ; J6.8@3025,-4460 v1(3130,-4460) ; J6.6@3025,-4410 v1(3130,-4410) ; J6.4@3025,-4360 3115,-4360 v1(3130,-4375) ; J6.2@3025,-4310 3100,-4310 v1(3130,-4340) ; v1@3120.03,-4760.03 v1(3130,-4760) ; U1.A7@2204.72,-3425.2 U1.B7@2204.72,-3385.83 ; U1.AP4@2321.1,-2117.98 U1.AP4@2321.14,-2118.02
  Top Layer w25: v1(3700.79,-842.52) 3700.79,-838.58 ccw(c3700.79,-837.37) 3702,-837.37 C87.1@3702,-803.56 ; v1(3763.78,-842.52) ccw(c3763.78,-838.3) 3768,-838.3 C86.1@3768,-802.56 ; v1(3905.51,-972.44) 3905.51,-956.6 cw(c3948.17,-956.6) U9.4@3948.17,-913.94 ; v1(3909.45,-854.33) 3909.45,-875.23 ccw(c3948.17,-875.23) U9.4@3948.17,-913.94 ; v1(3929.13,-1295.28) ccw(c3929.13,-1291.34) 3933.07,-1291.34 cw(c3933.07,-1288.27) 3930,-1288.27 C94.2@3930,-1255.56 ; v1(3944.88,-975.72) cw(c3948.17,-975.72) 3948.17,-972.44 U9.4@3948.17,-913.94 ; v1(3948.82,-854.33) 3948.17,-854.33 U9.4@3948.17,-913.94
  Bottom Layer w5: v1(1358.27,-3366.14) 1375.55,-3383.42 1388.51,-3383.42 C71.2@1398.61,-3393.52 1372.17,-3419.97 C70.2@1372.17,-3484.25 ; v1(1653.54,-3503.94) 1653.54,-3482.68 C54.2@1671.65,-3464.57
  Bottom Layer w8: v1(966.65,-2027.56) 988.37,-2027.56 1009.96,-2005.97 C80.2@1009.96,-1988.19 ; v1(1093.79,-2283.46) 1093.79,-2243.06 C79.2@1133.9,-2202.94 ; C78.2@1163.51,-2098.42 1174.27,-2087.66 1195.12,-2087.66 1196.17,-2086.61 v1(1220.47,-2086.61) 1220.47,-2061.14 1265.87,-2015.75 C72.2@1265.87,-1988.19 ; C78.2@1170.31,-2098.93 C78.2@1170.71,-2099.33 ; v1(1240.16,-2263.78) C73.2@1322.56,-2263.78 ; v1(1318.9,-2460.63) v1(1318.9,-2421.26) 1318.9,-2391.85 C74.2@1320.99,-2389.76 ; v1(1437.01,-2421.26) 1459.48,-2421.26 C68.2@1465.92,-2414.82 ; C65.2@1506.03,-2263.78 v1(1555.12,-2263.78) ; v1(1515.59,-2184.97) 1515.68,-2184.88 1515.68,-2157.06 1518.38,-2154.36 1518.38,-2148.63 C62.2@1526.98,-2140.03 ; C55.2@1663.51,-3169.29 1663.51,-3142 1673.23,-3132.28 v1(1673.23,-3129.92) ; v1(1712.6,-3287.4) v1@1715.66,-3284.34 ; v1(1791.34,-2972.44) 1791.34,-3010.24 C45.2@1792.91,-3011.81 ; v1(1870.08,-2421.26) 1870.08,-2416.93 1875.23,-2411.78 1875.23,-2384.61 C43.2@1877.95,-2381.89 ; v1(1909.45,-2539.37) 1909.45,-2540.18 1925.48,-2556.22 C39.2@1925.48,-2580.82 ; C41.2@1909.96,-2303.15 v1(1948.82,-2303.15) ; C38.2@1940.06,-2257.22 1940.06,-2287.98 1940.71,-2288.63 1940.71,-2290.72 1948.82,-2298.82 v1(1948.82,-2303.15) ; C31.2@1962.72,-2421.26 1962.72,-2417.32 1985.42,-2394.62 1985.42,-2384.95 v1(1988.48,-2381.89) ; C33.2@1970.08,-2342.52 1970.08,-2322.32 1950.91,-2303.15 v1(1948.82,-2303.15) ; v1(1988.19,-2618.11) C29.2@2031.22,-2618.11 ; C32.2@1989.58,-1927 1989.58,-1994.46 1985.78,-1998.26 1985.78,-2025.16 v1(2007.87,-2047.24) ; v1(2066.93,-2224.41) 2066.93,-2192.2 C27.2@2068.68,-2190.45 ; C24.2@2182.82,-2183.3 2184.56,-2185.04 v1(2224.41,-2185.04)
  Bottom Layer w10: J1.A82@-177.17,-4074.8 -56.97,-4074.8 v1(-37.28,-4055.12) ; J1.A77@-177.17,-3877.95 -49.6,-3877.95 -44.6,-3882.95 -19.14,-3882.95 v1(-17.6,-3884.5) ; J1.A71@-177.17,-3641.73 v1(41.46,-3641.73) ; J1.A67@-177.17,-3484.25 -37.28,-3484.25 v1(-17.6,-3464.57) ; J1.A58@-177.17,-3129.92 v1(41.46,-3129.92) ; J1.A56@-177.17,-3051.18 -17.6,-3051.18 v1(2.09,-3031.5) ; J1.A54@-177.17,-2972.44 -56.97,-2972.44 v1(-37.28,-2992.13) ; J1.A49@-177.17,-2775.59 -56.97,-2775.59 v1(-37.28,-2795.28) ; J1.A41@-177.17,-2460.63 2.09,-2460.63 v1(21.77,-2440.94) ; J1.A34@-177.17,-2185.04 v1(61.14,-2185.04) ; J1.A28@-177.17,-1948.82 v1(-56.97,-1948.82) ; J1.A17@-177.17,-1515.75 -63.85,-1515.75 v1(-37.28,-1542.32) ; J1.A6@-177.17,-1003.94 v1(21.77,-1003.94) ; J1.A5@-177.17,-964.57 v1(61.14,-964.57) ; J1.A2@-177.17,-846.46 -33.76,-846.46 -21.39,-858.83 v1(-17.6,-858.83) ; J1.A1@-177.17,-807.09 -37.28,-807.09 v1(-17.6,-826.77) ; C85.2@969.51,-2727.91 997.07,-2727.91 1045.13,-2679.84 1060.31,-2679.84 v1(1062.99,-2677.17) 1081.1,-2695.28 C81.2@1104.45,-2695.28 ; C84.2@1006.03,-2897.64 1021.77,-2913.39 v1(1102.36,-2913.39) ; C82.2@1104.45,-2557.48 1161.14,-2557.48 1175.32,-2543.31 1175.32,-2535.43 1183.14,-2527.61 1183.14,-2520.54 1200.79,-2502.89 v1(1200.79,-2500) 1198.11,-2497.32 1198.11,-2463.74 C77.2@1195,-2460.63 ; v1(1242.25,-3543.31) 1251.05,-3534.5 C75.2@1251.05,-3485.93 ; v1(1279.53,-2736.22) 1279.53,-2732.43 1285.51,-2726.45 1285.51,-2710.42 1295.28,-2700.66 C76.2@1295.28,-2696.72 ; v1(1358.27,-2972.44) 1396.06,-3010.24 C69.2@1439.1,-3010.24 1452.72,-2996.61 1455.84,-2996.61 1476.38,-2976.07 v1(1476.38,-2972.44) ; v1(1437.01,-3248.03) 1437.01,-3244.24 v1@1441.14,-3240.11 ; 1517.84,-3029.92 1516.79,-3030.96 1516.79,-3089.51 v1(1515.75,-3090.55) 1518.43,-3093.23 1528.39,-3093.23 1553.27,-3118.11 C61.2@1557.21,-3118.11 ; C60.2@1541.38,-2760.6 1541.38,-2798.23 1555.12,-2811.97 v1(1555.12,-2814.96) ; v1@1554.99,-2814.96 v1(1555.12,-2814.96) ; v1(1555.12,-3208.66) 1556.95,-3210.49 1556.95,-3246.2 C59.2@1558.78,-3248.03 ; C53.2@1615.55,-2677.09 1615.55,-2681.03 1670.74,-2736.22 v1(1673.23,-2736.22) ; C57.2@1635.95,-2833.07 1635.21,-2832.33 1575.93,-2832.33 1558.56,-2814.96 v1(1555.12,-2814.96) ; C51.2@1700.38,-2899.41 1742.47,-2899.41 1748.18,-2893.7 v1(1751.97,-2893.7) ; v1@1713.18,-2342.52 1716.96,-2342.52 1733.79,-2359.34 1738.79,-2359.34 C49.2@1749.55,-2370.1 1751.8,-2372.35 1751.8,-2459.95 C48.2@1754.06,-2462.2 ; C47.2@1754.06,-2204.72 1757.99,-2204.72 1775,-2221.73 1788.66,-2221.73 v1(1791.34,-2224.41) ; v1(1791.34,-2696.85) 1794.97,-2696.85 1817.6,-2719.48 1817.6,-2722.6 C44.2@1831.22,-2736.22 ; C42.2@1899.52,-2724.41 1909.28,-2734.17 1921.86,-2734.17 1923.91,-2736.22 v1(1948.82,-2736.22) 1948.82,-2736.75 C36.2@1989.23,-2777.17 ; v1(1909.45,-2893.7) 1910.49,-2892.66 1910.49,-2855.37 C40.2@1911.54,-2854.33 ; C35.2@1990.28,-2895.28 1991.06,-2894.49 2026.77,-2894.49 v1(2027.56,-2893.7) ; v1(2027.56,-3326.77) 2027.76,-3326.57 2027.76,-3278.16 C30.2@2027.96,-3277.96 ; v1(2027.56,-2814.96) 2030.24,-2817.64 2030.24,-2833.39 2051.26,-2854.41 C26.2@2051.26,-2858.35 ; v1(2185.04,-3464.57) v1@2186.9,-3462.7
  Bottom Layer w12: C83.2@1030.22,-3342.52 1033.58,-3342.52 1094.28,-3403.22 1100.07,-3403.22 v1(1102.36,-3405.51) ; C67.2@1478.47,-3099.02 1504.04,-3099.02 1512.5,-3090.55 v1(1515.75,-3090.55) ; C58.2@1569.02,-2460.63 1569.02,-2464.57 1593.2,-2488.75 1593.2,-2498.65 v1(1595.5,-2500.95) ; v1(1616.11,-2086.76) 1616.19,-2086.69 1655.04,-2086.69 C52.2@1655.12,-2086.61 ; C50.2@1712.6,-3013.39 C50.2@1713.39,-3012.6 ; v1(1712.6,-2972.44) 1712.6,-3011.81 C50.2@1713.39,-3012.6 ; C45.2@1792.91,-3011.81 1792.13,-3012.6 C50.2@1713.39,-3012.6 ; v1(1988.19,-3208.66) v1@1988.19,-3205.41 ; C25.2@2109.35,-2508.76 C25.2@2118.11,-2500 2118.11,-2496.06 2143.37,-2470.8 2143.37,-2462.93 v1(2145.67,-2460.63)
  Bottom Layer w20: J1.A10@-177.17,-1161.42 -47.83,-1161.42 -18.67,-1132.26 v1(-17.6,-1132.26) ; v1(1340.01,-3484.25) C70.2@1372.17,-3484.25 ; C34.2@1984.25,-3464.57 v1(2047.24,-3464.57) ; v1(2185.04,-3464.57) 2186.12,-3464.57 2199.9,-3450.79 2209.05,-3450.79 2209.05,-3397.54 C22.2@2220.77,-3385.83
  Bottom Layer w25: J1.A9@-177.17,-1122.05 -27.81,-1122.05 v1(-17.6,-1132.26) ; v1(964.57,-2776.55) 964.57,-2741 969.51,-2736.06 C85.2@969.51,-2727.91 ; v1(984.25,-2834.65) 984.25,-2884.55 997.34,-2897.64 C84.2@1006.03,-2897.64 ; C83.2@1006.03,-3342.52 C83.2@1030.22,-3342.52 ; v1(2204.72,-2027.56) 2202.88,-2025.71 2202.88,-1846.35 v1(2204.72,-1844.5) ; C22.2@2220.77,-3385.83 2220.77,-3291.04 v1(2224.41,-3287.4) ; v1(2283.46,-2027.56) 2283.46,-1935.16 C21.2@2289.49,-1929.13 2289.49,-1850.53 v1(2283.46,-1844.5) ; v1(2743.59,-2113.67) 2745.7,-2115.78 2745.7,-2185.06 C20.2@2758.79,-2198.15 2755.91,-2201.04 v1(2755.91,-2283.46)
  other v1: 353.51,-5366.5 453.51,-5366.5 553.51,-5366.5 653.51,-5366.5 753.51,-5366.5 853.51,-5366.5 953.51,-5366.5 1053.51,-5366.5 1353.51,-5366.5 1453.51,-5366.5 1553.51,-5366.5 1653.51,-5366.5 1753.51,-5366.5 1853.51,-5366.5 1953.51,-5366.5 2053.51,-5366.5 2153.51,-5366.5 2253.51,-5366.5 2553.51,-5366.5 2653.51,-5366.5 2753.51,-5366.5 2853.51,-5366.5 2953.51,-5366.5 3053.51,-5366.5 3153.51,-5366.5 3253.51,-5366.5 3353.51,-5366.5 3453.51,-5366.5 3853.51,-5366.5 3953.51,-5366.5 4053.51,-5366.5 4153.51,-5366.5 103.51,-5266.5 403.51,-5266.5 503.51,-5266.5 603.51,-5266.5 703.51,-5266.5 803.51,-5266.5 903.51,-5266.5 1003.51,-5266.5 1403.51,-5266.5 1503.51,-5266.5 1603.51,-5266.5 1703.51,-5266.5 1803.51,-5266.5 1903.51,-5266.5 2003.51,-5266.5 2103.51,-5266.5 2203.51,-5266.5 3303.51,-5266.5 3403.51,-5266.5 3503.51,-5266.5 3803.51,-5266.5 3903.51,-5266.5 4003.51,-5266.5 4103.51,-5266.5 4203.51,-5266.5 153.51,-5166.5 253.51,-5166.5 353.51,-5166.5 453.51,-5166.5 553.51,-5166.5 653.51,-5166.5 753.51,-5166.5 853.51,-5166.5 953.51,-5166.5 1053.51,-5166.5 1353.51,-5166.5 1453.51,-5166.5 1553.51,-5166.5 1653.51,-5166.5 1753.51,-5166.5 1853.51,-5166.5 1953.51,-5166.5 2053.51,-5166.5 2153.51,-5166.5 2253.51,-5166.5 3353.51,-5166.5 3453.51,-5166.5 3553.51,-5166.5 3653.51,-5166.5 3753.51,-5166.5 3853.51,-5166.5 3953.51,-5166.5 4053.51,-5166.5 4153.51,-5166.5 103.51,-5066.5 203.51,-5066.5 303.51,-5066.5 403.51,-5066.5 503.51,-5066.5 603.51,-5066.5 703.51,-5066.5 803.51,-5066.5 903.51,-5066.5 1003.51,-5066.5 1103.51,-5066.5 1203.51,-5066.5 1303.51,-5066.5 1403.51,-5066.5 1503.51,-5066.5 1603.51,-5066.5 1703.51,-5066.5 3403.51,-5066.5 3503.51,-5066.5 3603.51,-5066.5 3703.51,-5066.5 3803.51,-5066.5 3903.51,-5066.5 4003.51,-5066.5 4103.51,-5066.5 4203.51,-5066.5 153.51,-4966.5 253.51,-4966.5 353.51,-4966.5 453.51,-4966.5 553.51,-4966.5 653.51,-4966.5 753.51,-4966.5 853.51,-4966.5 953.51,-4966.5 1053.51,-4966.5 1153.51,-4966.5 1253.51,-4966.5 1353.51,-4966.5 1453.51,-4966.5 1553.51,-4966.5 1653.51,-4966.5 3453.51,-4966.5 3553.51,-4966.5 3653.51,-4966.5 3753.51,-4966.5 3853.51,-4966.5 3953.51,-4966.5 4053.51,-4966.5 4153.51,-4966.5 103.51,-4866.5 203.51,-4866.5 303.51,-4866.5 403.51,-4866.5 503.51,-4866.5 603.51,-4866.5 703.51,-4866.5 803.51,-4866.5 903.51,-4866.5 1003.51,-4866.5 1103.51,-4866.5 1203.51,-4866.5 1303.51,-4866.5 1403.51,-4866.5 1503.51,-4866.5 3503.51,-4866.5 3603.51,-4866.5 3703.51,-4866.5 3803.51,-4866.5 3903.51,-4866.5 4003.51,-4866.5 4103.51,-4866.5 4203.51,-4866.5 153.51,-4766.5 253.51,-4766.5 353.51,-4766.5 453.51,-4766.5 553.51,-4766.5 653.51,-4766.5 753.51,-4766.5 853.51,-4766.5 953.51,-4766.5 1053.51,-4766.5 1153.51,-4766.5 1253.51,-4766.5 1353.51,-4766.5 3553.51,-4766.5 3653.51,-4766.5 3753.51,-4766.5 3853.51,-4766.5 3953.51,-4766.5 4053.51,-4766.5 4153.51,-4766.5 103.51,-4666.5 203.51,-4666.5 303.51,-4666.5 403.51,-4666.5 503.51,-4666.5 603.51,-4666.5 703.51,-4666.5 803.51,-4666.5 903.51,-4666.5 1003.51,-4666.5 1103.51,-4666.5 1203.51,-4666.5 1303.51,-4666.5 1403.51,-4666.5 3603.51,-4666.5 3703.51,-4666.5 3803.51,-4666.5 3903.51,-4666.5 4003.51,-4666.5 4103.51,-4666.5 4203.51,-4666.5 153.51,-4566.5 253.51,-4566.5 353.51,-4566.5 453.51,-4566.5 553.51,-4566.5 653.51,-4566.5 753.51,-4566.5 853.51,-4566.5 953.51,-4566.5 1053.51,-4566.5 1153.51,-4566.5 1253.51,-4566.5 1353.51,-4566.5 3653.51,-4566.5 3753.51,-4566.5 3853.51,-4566.5 3953.51,-4566.5 4053.51,-4566.5 4153.51,-4566.5 103.51,-4466.5 203.51,-4466.5 303.51,-4466.5 403.51,-4466.5 503.51,-4466.5 603.51,-4466.5 703.51,-4466.5 803.51,-4466.5 903.51,-4466.5 1003.51,-4466.5 1103.51,-4466.5 1203.51,-4466.5 1303.51,-4466.5 1403.51,-4466.5 3703.51,-4466.5 3803.51,-4466.5 3903.51,-4466.5 4003.51,-4466.5 4103.51,-4466.5 4203.51,-4466.5 353.51,-4366.5 453.51,-4366.5 553.51,-4366.5 653.51,-4366.5 753.51,-4366.5 853.51,-4366.5 953.51,-4366.5 1053.51,-4366.5 1153.51,-4366.5 1253.51,-4366.5 1353.51,-4366.5 3753.51,-4366.5 3853.51,-4366.5 3953.51,-4366.5 4053.51,-4366.5 4153.51,-4366.5 103.51,-4266.5 403.51,-4266.5 503.51,-4266.5 603.51,-4266.5 703.51,-4266.5 803.51,-4266.5 903.51,-4266.5 1003.51,-4266.5 1103.51,-4266.5 1203.51,-4266.5 1303.51,-4266.5 1403.51,-4266.5 3803.51,-4266.5 3903.51,-4266.5 4003.51,-4266.5 4103.51,-4266.5 4203.51,-4266.5 153.51,-4166.5 253.51,-4166.5 353.51,-4166.5 453.51,-4166.5 553.51,-4166.5 653.51,-4166.5 753.51,-4166.5 853.51,-4166.5 953.51,-4166.5 1053.51,-4166.5 1353.51,-4166.5 3753.51,-4166.5 3853.51,-4166.5 3953.51,-4166.5 4053.51,-4166.5 4153.51,-4166.5 3.51,-4066.5 103.51,-4066.5 203.51,-4066.5 303.51,-4066.5 403.51,-4066.5 503.51,-4066.5 603.51,-4066.5 703.51,-4066.5 803.51,-4066.5 903.51,-4066.5 1003.51,-4066.5 1403.51,-4066.5 3803.51,-4066.5 3903.51,-4066.5 4003.51,-4066.5 4103.51,-4066.5 4203.51,-4066.5 653.51,-3966.5 753.51,-3966.5 853.51,-3966.5 953.51,-3966.5 1053.51,-3966.5 1353.51,-3966.5 3753.51,-3966.5 3853.51,-3966.5 3953.51,-3966.5 4053.51,-3966.5 4153.51,-3966.5 1303.51,-3866.5 1403.51,-3866.5 3803.51,-3866.5 3903.51,-3866.5 4003.51,-3866.5 4103.51,-3866.5 4203.51,-3866.5 3853.51,-3766.5 3953.51,-3766.5 4053.51,-3766.5 4153.51,-3766.5 603.51,-3666.5 703.51,-3666.5 803.51,-3666.5 903.51,-3666.5 1103.51,-3666.5 3903.51,-3666.5 4003.51,-3666.5 4103.51,-3666.5 4203.51,-3666.5 653.51,-3566.5 853.51,-3566.5 3853.51,-3566.5 3953.51,-3566.5 4053.51,-3566.5 4153.51,-3566.5 703.51,-3466.5 903.51,-3466.5 3903.51,-3466.5 4003.51,-3466.5 4103.51,-3466.5 4203.51,-3466.5 3619.04,-3366.15 3853.51,-3366.5 3953.51,-3366.5 4053.51,-3366.5 4153.51,-3366.5 3803.51,-3266.5 3903.51,-3266.5 4003.51,-3266.5 4103.51,-3266.5 4203.51,-3266.5 353.51,-3166.5 553.51,-3166.5 3853.51,-3166.5 3953.51,-3166.5 4053.51,-3166.5 4153.51,-3166.5 203.51,-3066.5 503.51,-3066.5 3803.51,-3066.5 3903.51,-3066.5 4003.51,-3066.5 4103.51,-3066.5 4203.51,-3066.5 253.51,-2966.5 553.51,-2966.5 753.51,-2966.5 3853.51,-2966.5 3953.51,-2966.5 4053.51,-2966.5 4153.51,-2966.5 403.51,-2866.5 3803.51,-2866.5 3903.51,-2866.5 4003.51,-2866.5 4103.51,-2866.5 4203.51,-2866.5 3853.51,-2766.5 3953.51,-2766.5 4053.51,-2766.5 4153.51,-2766.5 3803.51,-2666.5 3903.51,-2666.5 4003.51,-2666.5 4103.51,-2666.5 4203.51,-2666.5 3853.51,-2566.5 3953.51,-2566.5 4053.51,-2566.5 4153.51,-2566.5 3803.51,-2466.5 3903.51,-2466.5 4003.51,-2466.5 4103.51,-2466.5 4203.51,-2466.5 3753.51,-2366.5 3853.51,-2366.5 3953.51,-2366.5 4053.51,-2366.5 4153.51,-2366.5 3703.51,-2266.5 3803.51,-2266.5 3903.51,-2266.5 4003.51,-2266.5 4103.51,-2266.5 4203.51,-2266.5 3753.51,-2166.5 3853.51,-2166.5 3953.51,-2166.5 4053.51,-2166.5 4153.51,-2166.5 3703.51,-2066.5 3803.51,-2066.5 3903.51,-2066.5 4003.51,-2066.5 4103.51,-2066.5 4203.51,-2066.5 53.51,-1966.5 3753.51,-1966.5 3853.51,-1966.5 3953.51,-1966.5 4053.51,-1966.5 4153.51,-1966.5 3703.51,-1866.5 3803.51,-1866.5 3903.51,-1866.5 4003.51,-1866.5 4103.51,-1866.5 4203.51,-1866.5 3453.51,-1766.5 3753.51,-1766.5 3853.51,-1766.5 3953.51,-1766.5 4053.51,-1766.5 4153.51,-1766.5 3703.51,-1666.5 3803.51,-1666.5 3903.51,-1666.5 4003.51,-1666.5 4103.51,-1666.5 4203.51,-1666.5 3453.51,-1566.5 3753.51,-1566.5 3853.51,-1566.5 3953.51,-1566.5 4053.51,-1566.5 4153.51,-1566.5 3403.51,-1466.5 3703.51,-1466.5 3803.51,-1466.5 3903.51,-1466.5 4003.51,-1466.5 4103.51,-1466.5 4203.51,-1466.5 3253.51,-1366.5 3353.51,-1366.5 3453.51,-1366.5 3753.51,-1366.5 3853.51,-1366.5 3953.51,-1366.5 4053.51,-1366.5 4153.51,-1366.5 3203.51,-1266.5 3303.51,-1266.5 3403.51,-1266.5 3703.51,-1266.5 3803.51,-1266.5 4003.51,-1266.5 4103.51,-1266.5 4203.51,-1266.5 3553.51,-1166.5 3753.51,-1166.5 4153.51,-1166.5 3103.51,-1066.5 3303.51,-1066.5 3503.51,-1066.5 3603.51,-1066.5 3703.51,-1066.5 3803.51,-1066.5 4203.51,-1066.5 3925.2,-1007.87 3991.81,-976.35 3753.51,-966.5 403.51,-866.5 503.51,-866.5 603.51,-866.5 703.51,-866.5 803.51,-866.5 903.51,-866.5 1003.51,-866.5 1103.51,-866.5 1203.51,-866.5 1303.51,-866.5 1403.51,-866.5 1503.51,-866.5 1603.51,-866.5 1703.51,-866.5 1803.51,-866.5 3803.51,-866.5 4203.51,-866.5 3988.19,-854.33 3909.45,-814.96 3948.82,-814.96 453.51,-766.5 553.51,-766.5 653.51,-766.5 753.51,-766.5 853.51,-766.5 953.51,-766.5 1053.51,-766.5 1153.51,-766.5 1253.51,-766.5 1353.51,-766.5 1453.51,-766.5 1553.51,-766.5 1653.51,-766.5 1753.51,-766.5 1853.51,-766.5 4153.51,-766.5 403.51,-666.5 503.51,-666.5 603.51,-666.5 703.51,-666.5 803.51,-666.5 903.51,-666.5 1003.51,-666.5 1103.51,-666.5 1203.51,-666.5 1303.51,-666.5 1403.51,-666.5 1503.51,-666.5 1603.51,-666.5 1703.51,-666.5 1803.51,-666.5 4203.51,-666.5 453.51,-566.5 553.51,-566.5 653.51,-566.5 753.51,-566.5 853.51,-566.5 953.51,-566.5 1053.51,-566.5 1153.51,-566.5 1253.51,-566.5 1353.51,-566.5 1453.51,-566.5 1553.51,-566.5 1653.51,-566.5 1753.51,-566.5 1853.51,-566.5 3853.51,-566.5 3953.51,-566.5 4053.51,-566.5 4153.51,-566.5 403.51,-466.5 503.51,-466.5 603.51,-466.5 703.51,-466.5 803.51,-466.5 903.51,-466.5 1003.51,-466.5 1103.51,-466.5 1203.51,-466.5 1303.51,-466.5 1403.51,-466.5 1503.51,-466.5 1603.51,-466.5 1703.51,-466.5 1803.51,-466.5 3803.51,-466.5 4203.51,-466.5 453.51,-366.5 553.51,-366.5 653.51,-366.5 753.51,-366.5 853.51,-366.5 953.51,-366.5 1053.51,-366.5 1153.51,-366.5 1253.51,-366.5 1353.51,-366.5 1453.51,-366.5 1553.51,-366.5 1653.51,-366.5 1753.51,-366.5 1853.51,-366.5 3853.51,-366.5 4053.51,-366.5 4153.51,-366.5 403.51,-266.5 503.51,-266.5 603.51,-266.5 703.51,-266.5 803.51,-266.5 903.51,-266.5 1003.51,-266.5 1103.51,-266.5 1203.51,-266.5 1303.51,-266.5 1403.51,-266.5 1503.51,-266.5 1603.51,-266.5 1703.51,-266.5 1803.51,-266.5 1903.51,-266.5 2003.51,-266.5 2103.51,-266.5 2203.51,-266.5 2303.51,-266.5 2603.51,-266.5 2803.51,-266.5 2903.51,-266.5 3003.51,-266.5 3103.51,-266.5 3303.51,-266.5 3703.51,-266.5 4003.51,-266.5 4203.51,-266.5 453.51,-166.5 553.51,-166.5 653.51,-166.5 753.51,-166.5 853.51,-166.5 953.51,-166.5 1053.51,-166.5 1153.51,-166.5 1253.51,-166.5 1353.51,-166.5 1453.51,-166.5 1553.51,-166.5 1653.51,-166.5 1753.51,-166.5 1853.51,-166.5 1953.51,-166.5 2053.51,-166.5 2153.51,-166.5 2253.51,-166.5 2653.51,-166.5 3153.51,-166.5 3253.51,-166.5 3353.51,-166.5 3453.51,-166.5 3553.51,-166.5 3653.51,-166.5 3753.51,-166.5 3853.51,-166.5 3953.51,-166.5 4053.51,-166.5 4153.51,-166.5 103.51,-66.5 203.51,-66.5 303.51,-66.5 403.51,-66.5 503.51,-66.5 603.51,-66.5 703.51,-66.5 803.51,-66.5 903.51,-66.5 1003.51,-66.5 1103.51,-66.5 1203.51,-66.5 1303.51,-66.5 1403.51,-66.5 1503.51,-66.5 1603.51,-66.5 1703.51,-66.5 1803.51,-66.5 1903.51,-66.5 2003.51,-66.5 2103.51,-66.5 2203.51,-66.5 2303.51,-66.5 2403.51,-66.5 2503.51,-66.5 2603.51,-66.5 2703.51,-66.5 2803.51,-66.5 2903.51,-66.5 3003.51,-66.5 3103.51,-66.5 3203.51,-66.5 3303.51,-66.5 3403.51,-66.5 3503.51,-66.5 3603.51,-66.5 3703.51,-66.5 3803.51,-66.5 3903.51,-66.5 4003.51,-66.5 4103.51,-66.5 4203.51,-66.5